# Altium PCB Thunderbolt3.pcbdoc (part 2 of 5)
Units mm, origin at the board's own origin, x right, y up, seen from the top; angles counter-clockwise.
Board outline 43.92 x 41.77 mm, 6 copper layers (TopLayer, MidLayer1, MidLayer2, MidLayer3, MidLayer4, BottomLayer); 211 components, 193 nets, 1132 pads, 744 vias.
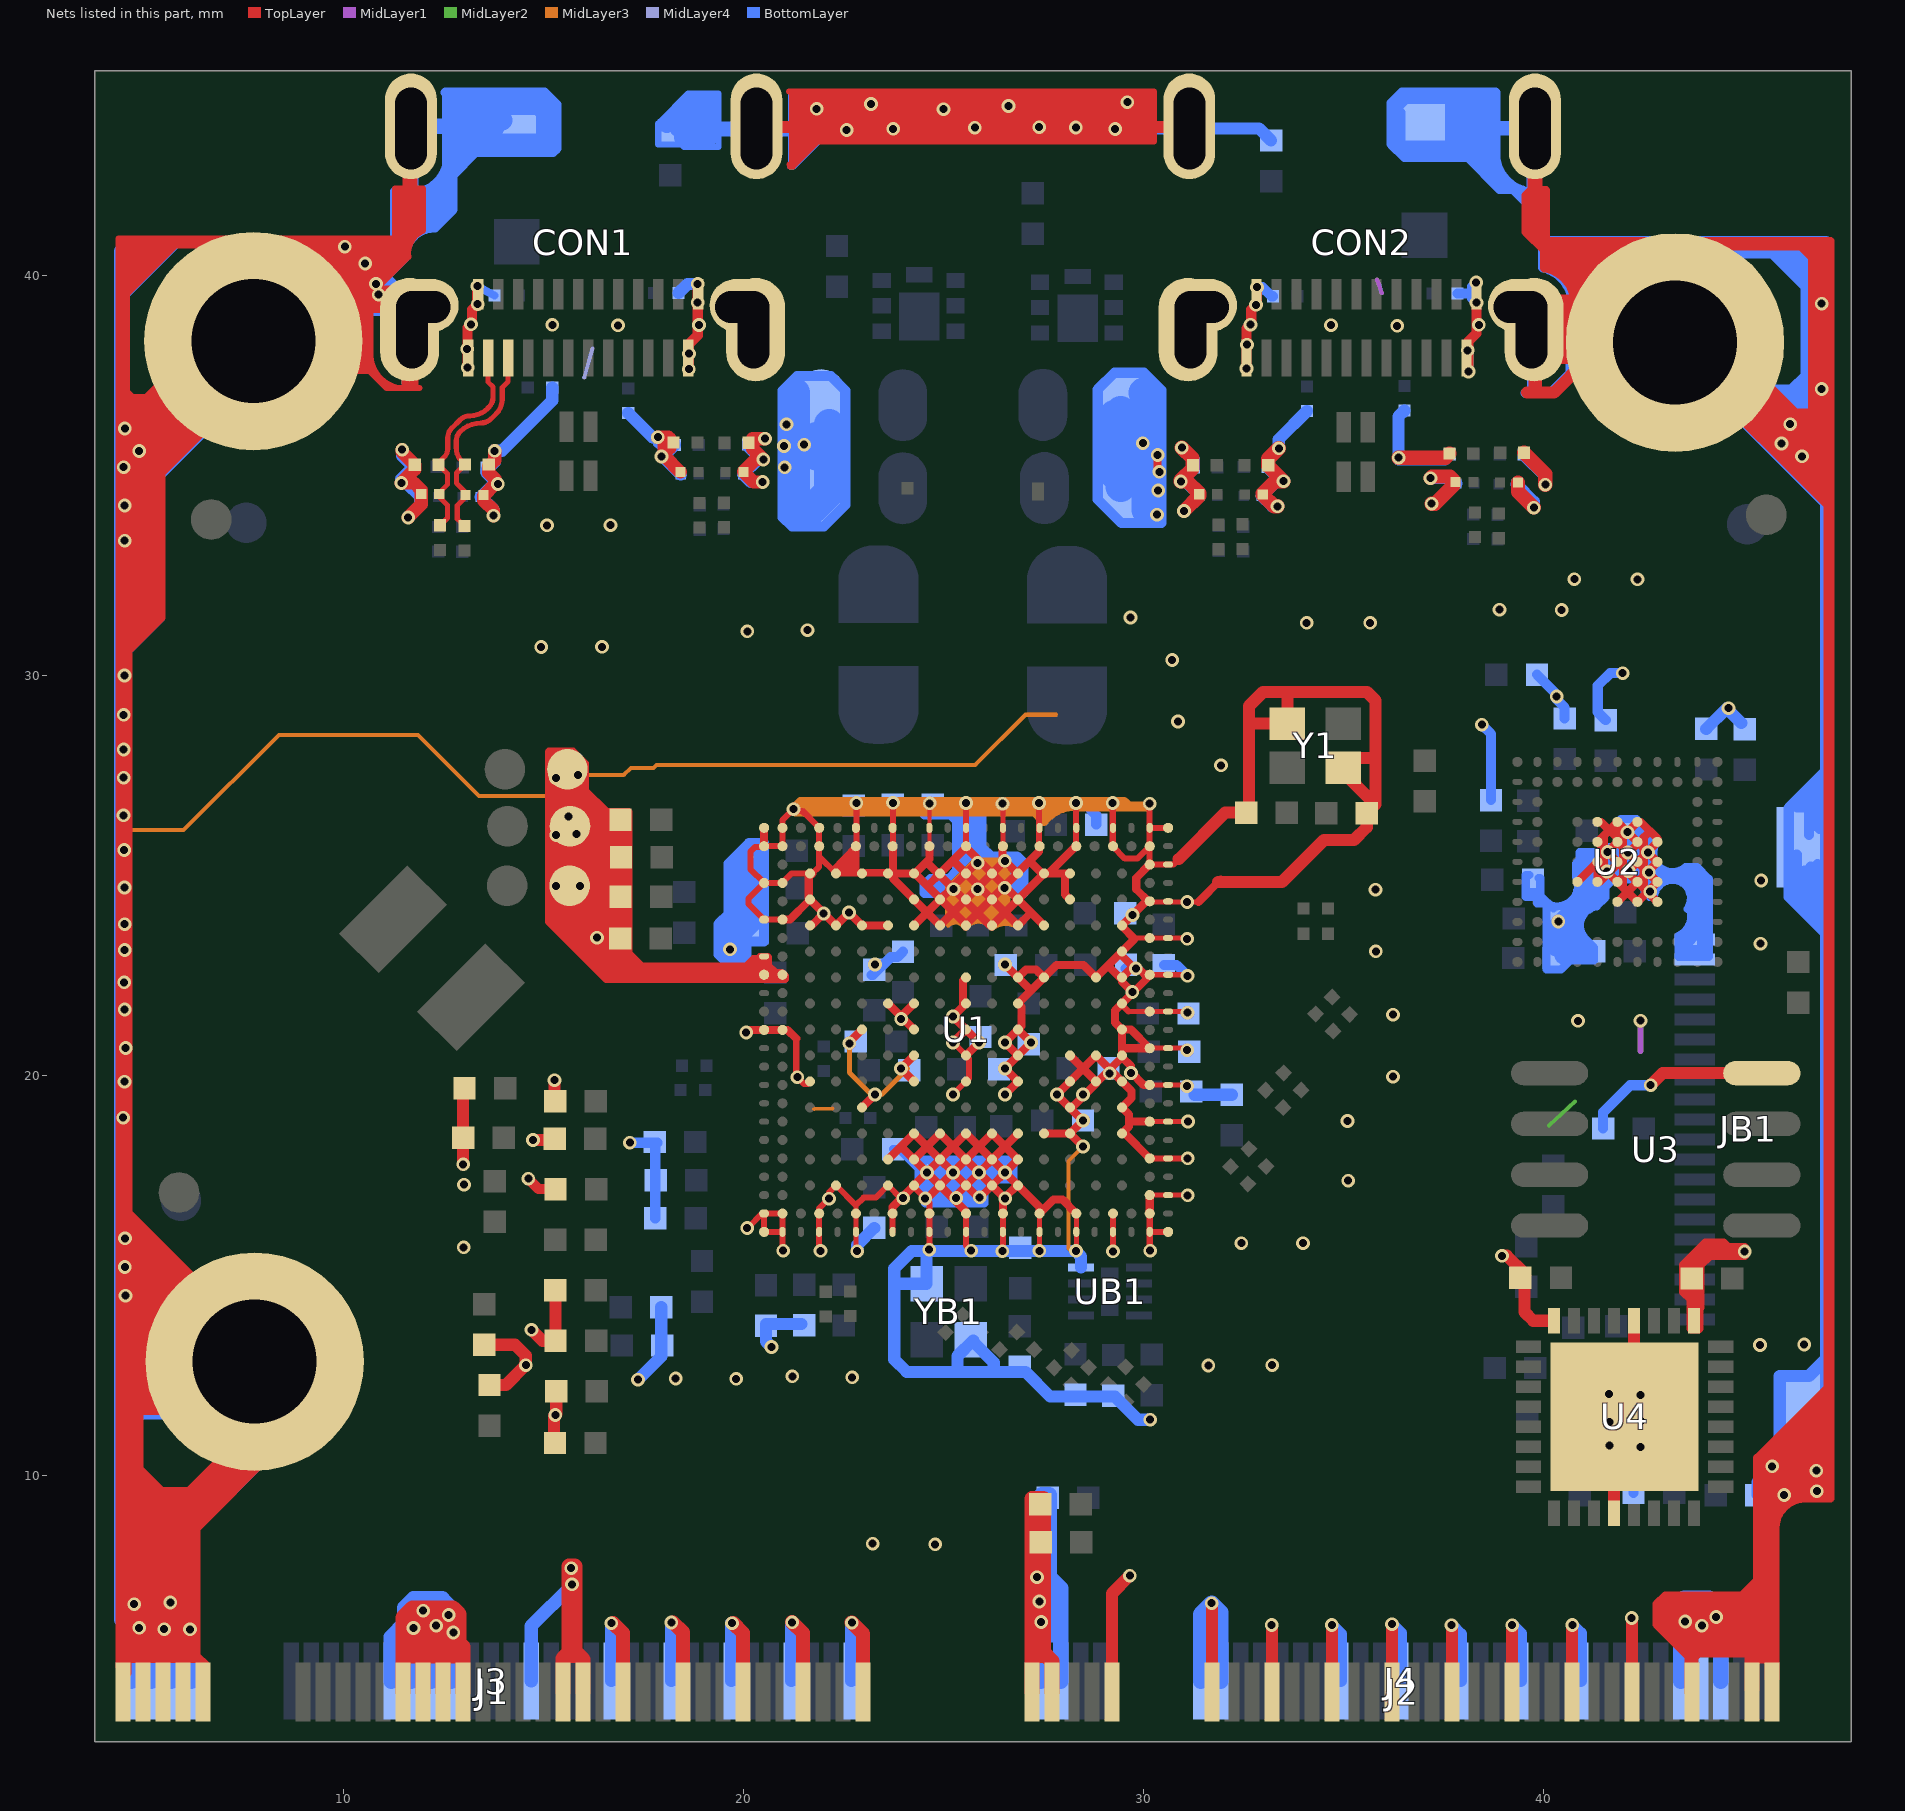
[diagram p6: the nets of this part, all layers, seen from the top]

## Via types
v1: diameter 0.343, hole 0.2, TopLayer to BottomLayer, tented both sides, 632 vias
v2: diameter 0.8, hole 0.8, TopLayer to BottomLayer, 112 vias

## Nets (pads, with @x,y where several pads share a name; then routed paths per layer and width w, separated by ;. In a path a pad name is that pad's centre, name@x,y a point inside that pad or via, vN(x,y) a via of type N, cw(c..) or ccw(c..) an arc to the next point about the centre after c; other vN are vias at no path point)
GND: C9.2 C10.2 C11.1 C12.1 C13.2 C14.2 C15.1 C16.1 C17.1 C36.1 C37.1 C38.1 C39.1 C200.1 C201.1 C202.1 C203.1 C204.1 C205.1 C206.1 C207.2 C208.1 C209.1 C210.2 C211.1 C212.1 C213.2 C214.2 C215.1 C216.2 C219.1 C220.2 CB1.1 CB2.1 CB3.1 CB4.1 CB5.1 CB6.2 CB7.1 CB8.2 CB9.2 CB10.1 CB11.1 CB12.1 CB17.1 CB18.2 CB23.2 CB24.2 CB25.1 CB26.2 CB27.2 CB28.1 CB29.2 CB30.2 CB34.1 CB35.2 CB36.1 CB37.1 CB38.1 CB39.1 CB41.1 CB50.1 CB51.2 CB52.2 CB53.2 CB54.2 CB55.1 CB56.1 CB58.1 CB61.1 CB64.2 CB68.2 CB69.2 CB70.1 CB72.1 CB74.2 CB75.1 CB76.1 CB77.1 CON1.1 CON1.2 CON1.3 CON1.4 CON1.5 CON1.6 CON1.A1 CON1.A12 CON1.B1 CON1.B12 CON2.1 CON2.2 CON2.3 CON2.4 CON2.5 CON2.6 CON2.A1 CON2.A12 CON2.B1 CON2.B12 D1.2 D2.2 D3.2 D4.2 D5.2 D6.2 D7.2 D8.2 DB1.1 DB2.1 DB3.2 DB4.2 DB5.2 DB6.2 DB7.2 DB8.2 DB9.2 DB10.2 J1.1 J1.7 J1.13 J1.19 J1.25 J1.29 J1.31 J1.41 J1.43 J1.45 J1.47 J1.67 J1.69 J1.71 J1.73 J1.75 J2.1 J2.3 J2.9 J2.15 J2.21 J2.27 J2.33 J2.39 J2.45 J2.51 J2.57 J2.67 J2.73 J2.75 J3.2 J3.8 J3.14 J3.20 J3.26 J3.34 J3.42 J3.44 J3.46 J3.48 J3.68 J3.70 J3.72 J3.74 J4.6 J4.8 J4.10 J4.20 J4.26 J4.32 J4.38 J4.44 J4.56 J4.58 J4.72 J4.74 JB1.19 JB1.20 JB1.21 JB1.22 pad.9 pad.10 pad.11 R1.1 R2.2 R3.1 R4.2 R5.1 R6.2 R7.1 R8.2 R11.1 R12.1 R14.1 R15.1 R16.1 R18.1 R19.2 R20.1 R21.1 R22.1 R23.1 RB3.1 RB4.2 RB5.1 RB6.2 RB7.1 RB8.2 RB9.1 RB10.2 RB12.1 RB15.1 RB19.1 RB21.1 RB23.1 RB24.1 RB25.1 RB27.1 RB28.1 RB30.2 RB31.2 U1.A1 U1.A2 U1.A4 U1.A6 U1.A8 U1.A10 U1.A12 U1.A14 U1.A16 U1.A18 U1.A20 U1.A22 U1.A23 U1.AA22 U1.AA23 U1.AB1 U1.AB2 U1.AB4 U1.AB6 U1.AB8 U1.AB10 U1.AB12 U1.AB14 U1.AB16 U1.AB18 U1.AB20 U1.AB22 U1.AC1 U1.AC2 U1.AC4 U1.AC6 U1.AC8 U1.AC10 U1.AC12 U1.AC14 U1.AC16 U1.AC18 U1.AC20 U1.AC22 U1.AC23 U1.B1 U1.B2 U1.B4 U1.B6 U1.B8 U1.B10 U1.B12 U1.B14 U1.B16 U1.B18 U1.B20 U1.B22 U1.C22 U1.C23 U1.D1 U1.D2 U1.D4 U1.D5 U1.D6 U1.D8 U1.D9 U1.D11 U1.D12 U1.D13 U1.D15 U1.D16 U1.D18 U1.E4 U1.E9 U1.E11 U1.E12 U1.E13 U1.E15 U1.E18 U1.E22 U1.E23 U1.F1 U1.F2 U1.F4 U1.F5 U1.F6 U1.F8 U1.F9 U1.F11 U1.F12 U1.F13 U1.F15 U1.F16 U1.F20 U1.G22 U1.G23 U1.H1 U1.H20 U1.J1 U1.J2 U1.J12 U1.J15 U1.J16 U1.J19 U1.J20 U1.J22 U1.J23 U1.L8 U1.L9 U1.L12 U1.L15 U1.L20 U1.L22 U1.L23 U1.M1 U1.M2 U1.M6 U1.M9 U1.M12 U1.M15 U1.M20 U1.N9 U1.N12 U1.N15 U1.N18 U1.N19 U1.N20 U1.N22 U1.N23 U1.R4 U1.R9 U1.R12 U1.R15 U1.R18 U1.R19 U1.R20 U1.R22 U1.R23 U1.T6 U1.T18 U1.T20 U1.U22 U1.U23 U1.V9 U1.V11 U1.V12 U1.V13 U1.V15 U1.V16 U1.V18 U1.V20 U1.W8 U1.W9 U1.W11 U1.W12 U1.W13 U1.W15 U1.W22 U1.W23 U1.Y5 U1.Y8 U1.Y9 U1.Y11 U1.Y12 U1.Y13 U1.Y15 U2.D5 U2.D6 U2.D7 U2.D8 U2.E4 U2.E5 U2.E6 U2.E7 U2.E8 U2.F4 U2.F5 U2.F6 U2.F7 U2.F8 U2.G4 U2.G5 U2.G6 U2.G7 U2.H7 U3.4 U4.0 U4.4 U4.17 U4.20 U4.24 UB1.4 Y1.2 Y1.4 YB1.2 YB1.4 | length 1691
  TopLayer w0.102: U1.B10@24.648,25.747 v1(24.648,26.815)
  TopLayer w0.127: v1@22.806,15.65 22.806,16.763 ; U1.B14@26.478,25.742 v1@26.478,26.795 ; v1@27.397,15.632 U1.AB16@27.397,16.56 ; v1@28.315,15.635 U1.AB18@28.315,16.56 ; 29.618,21.61 U1.L23@30.61,21.61 v1@31.012,21.61 ; 29.679,23.442 v1@30.993,23.442 ; 30,19.773 U1.R23@30.61,19.773 v1@30.917,19.773 ; U1.E22@30.043,24.346 31.366,24.346 ; U1.AA22@30.151,17.019 U1.AA23@30.61,17.019 v1@31.095,17.019 ; U1.U22@30.151,18.855 v1@31.061,18.855 ; U1.N22@30.151,20.692 U1.N23@30.61,20.692 v1@31.152,20.692 ; U1.J22@30.176,22.528 v1@31.065,22.528
  TopLayer w0.152: J1.75@4.618,5.058 4.618,5.4 6.335,5.4 6.573,5.163 J1.67@6.573,5.113 ; J1.75@4.618,5.228 4.365,5.228 4.365,40.938 11.285,40.938 11.285,42.185 11.983,42.185 11.983,41.13 ccw(c12.242,40.555) 11.615,40.478 10.933,39.795 10.933,39.64 11.703,39.64 CON1.4@11.703,39.433 ; J1.67@6.573,4.915 6.573,5.288 6.34,5.52 6.34,8.67 8.23,10.56 8.23,12.995 4.648,16.578 4.648,30.628 5.463,31.443 5.463,35.053 8.033,37.623 10.643,37.623 11.07,37.195 11.89,37.195 11.788,37.195 11.788,38.291 11.523,38.291 11.523,37.195 ; 10.665,37.623 10.665,39.145 11.535,39.145 CON1.4@11.535,39.055 ; 10.665,38.01 ccw(c11.537,38.049) 11.36,37.195 ; 11.653,37.195 CON1.3@11.653,38.195 ; v1(20.06,21.086) v1@20.125,21.151 ; v1@20.095,16.196 20.459,16.56 U1.AB2@20.969,16.56 v1@20.969,15.631 ; U1.AB1@20.51,16.56 U1.AC1@20.51,16.101 U1.AC2@20.969,16.101 ; U1.B1@20.51,25.725 20.285,25.725 20.168,25.608 20.168,25.166 U1.D1@20.51,24.823 ; U1.B1@20.51,25.742 U1.B2@20.969,25.742 20.969,26.392 21.2,26.623 21.465,26.623 U1.A4@21.887,26.201 U1.B4@21.887,25.742 ; U1.F2@20.969,23.905 U1.F1@20.51,23.905 20.118,24.297 20.118,24.431 U1.D1@20.51,24.823 ; 21.15,42.78 21.208,42.838 21.208,44.605 21.133,44.605 30.253,44.605 30.253,43.36 21.853,43.36 21.228,42.735 21.153,42.735 ; 21.313,20.93 21.313,19.995 21.505,19.803 21.6,19.803 U1.R4@21.658,19.86 ; v1(21.918,15.626) 21.887,15.656 21.887,16.687 v1(22.13,16.93) 22.13,17.083 U1.Y5@22.308,17.26 22.806,16.763 23.001,16.958 23.305,16.958 U1.Y8@23.608,17.26 v1@23.925,16.943 ; U1.D5@22.232,25.136 U1.B6@22.815,25.751 ; 22.413,25.203 22.815,25.145 22.718,25.455 22.62,25.27 22.772,25.282 ; v1(22.815,26.821) U1.B6@22.815,25.751 ; U1.AC8@23.724,16.101 U1.AB8@23.724,16.56 ; U1.B8@23.73,25.748 v1(23.73,26.826) ; U1.Y9@24.234,17.236 24.642,16.829 24.642,15.657 v1(24.638,15.653) ; v1(25.233,19.535) 25.633,19.935 25.633,20.435 v1(25.233,20.835) ; U1.B12@25.555,25.747 v1(25.555,26.823) ; U1.AB12@25.56,16.608 25.56,15.756 v1(25.688,15.628) ; v1(26.465,15.618) 26.478,15.631 U1.AB14@26.478,16.56 ; U1.B16@27.383,25.755 v1(27.383,26.821) ; U1.B18@28.308,25.749 v1(28.308,26.823) ; v1(29.225,26.823) 29.225,25.735 29.528,25.433 29.838,25.433 U1.B22@30.147,25.742 ; v1@29.233,15.728 U1.AB20@29.233,16.56 ; U1.L20@29.438,21.79 29.618,21.61 ; U1.C22@30.148,25.286 30.148,25.623 v1(30.148,26.806) ; U1.A22@30.148,26.201 U1.A23@30.61,26.201 ; v1@30.151,15.735 U1.AB22@30.151,16.56 ; U1.AC22@30.151,16.101 U1.AC23@30.61,16.101 ; U1.W22@30.151,17.937 v1(31.1,17.938) ; U1.J22@30.151,22.503 U1.J22@30.176,22.528 ; U1.C22@30.151,25.282 U1.C23@30.61,25.282 30.74,25.282 30.875,25.418 ; U1.D1@20.51,24.823 20.964,24.823 21.2,25.06 21.72,25.06 21.887,25.227 U1.B4@21.887,25.742 ; U1.B4@21.887,25.742 21.887,25.481 U1.D5@22.308,25.06 ; U1.D5@22.308,25.06 U1.D8@23.608,25.06 23.608,25.099 22.815,25.099 U1.B6@22.815,25.751 ; U1.D5@22.308,25.06 U1.B6@22.815,25.751
  TopLayer w0.203: v1@20.125,21.151 21.093,21.151 21.313,20.93 ; U1.B1@20.51,25.725 U1.A1@20.51,26.201 ; U1.F2@20.969,23.905 21.153,23.905 21.625,24.378 21.625,24.965 U1.D4@21.72,25.06 ; U1.F4@21.658,23.76 21.7,23.76 v1(21.998,24.058) ; U1.E4@21.658,24.41 U1.F5@22.308,23.76 v1(22.633,24.085) U1.F6@22.958,23.76 U1.F8@23.608,23.76 ; v1@22.64,20.843 U1.M6@22.958,21.16 ; U1.T6@22.958,19.21 v1(23.283,19.535) ; U1.W8@23.608,17.91 U1.V9@24.258,18.56 v1@25.853,16.965 ; U1.L8@23.608,21.81 U1.M9@24.258,21.16 ; U1.D8@23.608,25.06 U1.D9@24.283,25.06 ; U1.AB8@23.724,16.56 23.724,16.726 U1.V12@25.558,18.56 27.397,16.722 U1.AB16@27.397,16.56 27.745,16.908 27.967,16.908 U1.AB18@28.315,16.56 ; U1.B8@23.73,25.748 23.73,24.938 U1.F11@24.908,23.76 26.47,25.323 U1.B14@26.47,25.75 ; v1@23.935,21.488 U1.L9@24.258,21.81 ; 23.974,18.194 25.56,16.608 U1.AB12@25.56,16.56 ; U1.W9@24.258,17.91 U1.V11@24.908,18.56 v1@26.533,16.935 ; U1.R9@24.258,19.86 v1(23.933,20.185) U1.N9@24.258,20.51 ; U1.F9@24.258,23.76 v1@25.825,25.328 ; v1@24.58,16.933 U1.V13@26.208,18.56 U1.W15@26.858,17.91 v1@25.913,16.965 ; 24.583,25.36 24.583,25.33 26.153,23.76 U1.F13@26.208,23.76 U1.D16@27.508,25.06 ; 24.613,24.765 U1.D11@24.908,25.06 U1.B12@25.555,25.708 ; U1.B10@24.648,25.747 24.648,25.425 U1.D9@24.283,25.06 ; v1(25.233,20.835) U1.M12@25.558,21.16 ; 25.274,25.344 U1.F15@26.858,23.76 27.152,24.054 ; v1@25.313,17.015 U1.V15@26.858,18.56 ; U1.B12@25.555,25.747 25.555,25.713 U1.F16@27.508,23.76 ; U1.N12@25.558,20.51 v1(25.883,20.835) v1(25.233,21.485) 25.478,21.73 25.478,22.38 U1.J12@25.558,22.46 ; U1.AB14@26.478,16.56 v1@26.478,16.876 ; v1(26.528,25.378) U1.D15@26.83,25.075 ; v1(26.533,19.535) U1.R15@26.858,19.86 v1(26.533,20.185) U1.N15@26.858,20.51 ; v1(26.533,22.785) 27.123,22.195 ; v1@26.538,16.968 U1.Y15@26.844,17.274 ; U1.M15@26.858,21.16 v1(27.183,20.835) U1.N15@26.858,20.51 ; U1.J15@26.858,22.46 27.055,22.658 27.31,22.658 U1.J16@27.508,22.46 ; 27.147,25.374 27.46,25.06 U1.D18@28.158,25.06 ; U1.B16@27.383,25.755 27.383,25.61 25.558,23.785 U1.D9@24.283,25.06 ; U1.V16@27.508,18.56 U1.V18@28.158,18.56 ; U1.D16@27.619,25.06 U1.B18@28.308,25.749 ; 28.035,24.955 28.035,24.533 U1.E18@28.158,24.41 ; U1.N18@28.158,20.51 U1.R19@28.797,19.871 ; U1.T18@28.203,19.21 U1.N20@29.458,20.465 ; v1@28.47,18.885 27.833,19.523 v1(27.833,19.535) U1.N19@28.808,20.51 29.693,19.625 29.693,19.445 U1.T20@29.458,19.21 29.633,19.035 29.633,18.735 U1.V20@29.458,18.56 29.528,18.56 U1.W22@30.151,17.937 ; v1(28.483,18.235) U1.V18@28.158,18.56 ; v1(28.483,18.885) U1.V18@28.158,18.56 ; 29.17,22.69 29.458,22.403 U1.J20@29.458,22.353 ; U1.H20@29.458,23.003 v1@29.775,22.685 ; U1.F20@29.458,23.741 29.773,23.426 U1.J19@28.808,22.46 28.495,22.773 27.82,22.773 U1.L15@26.858,21.81 26.94,21.728 26.94,21.243 v1(26.533,20.835) U1.N15@26.858,20.51 ; U1.F20@29.458,23.76 U1.E22@30.043,24.346 ; 29.474,20.692 U1.N22@30.151,20.692 29.682,21.16 U1.M20@29.458,21.16 ; v1(29.715,22.095) U1.J20@29.458,22.353 ; 29.753,18.855 U1.U22@30.151,18.855 ; U1.E22@30.133,24.346 29.813,24.666 29.813,24.951 U1.C22@30.148,25.286 ; U1.AB22@30.151,16.56 U1.AA22@30.151,17.019 ; U1.R22@30.151,19.773 30,19.773 29.68,20.093 29.68,20.243 U1.N20@29.458,20.465 ; v1(30.348,35.523) 30.348,35.101 v1(30.39,35.101) ; 31.366,24.346 31.925,24.905 ; v2(39.7,38.291) 39.715,38.291 39.715,37.105 39.855,37.105 CON2.6@39.855,37.783 ; 39.773,41.778 39.693,41.778 39.693,43.11 39.868,43.11 39.868,41.578 ; CON2.6@39.778,37.903 40.953,37.903 40.953,39.433 39.843,39.433 CON2.5@39.843,39.188 ; 40.53,38.008 40.53,39.313 40.81,39.313 pad.10@40.81,38.098 ; pad.10@40.703,38.885 40.703,39.21 ; pad.10@40.72,38.013 pad.10@40.72,39.095 ; 40.765,39.433 ccw(c39.867,39.293) 40.013,40.19 40.013,40.628 39.548,41.093 39.548,42.015 39.673,42.14 40.06,42.14 40.06,40.87 47.165,40.87 47.165,9.433 46.535,9.433 ccw(c46.535,8.693) 45.795,8.693 45.795,4.93 45.62,4.93 45.62,5.41 45.298,5.41 45.298,4.663 45.123,4.663 45.123,5.565 43.885,5.565 43.773,5.453 43.773,4.598 43.623,4.598 43.623,5.478 42.82,6.28 42.82,6.793 43.038,7.01 44.955,7.01 45.338,7.393 45.338,10.453 47.1,12.215 47.1,34.255 43.793,37.563 pad.10@42.643,37.563 ; U2.H7@40.843,24.851 U2.E4@42.343,26.351 42.425,26.351 42.843,25.933 U2.D5@42.843,25.851 U2.F7@41.843,24.851 ; U2.G6@41.343,25.228 U2.G7@41.343,24.851 41.396,24.851 42.66,26.115 ; U2.G6@41.343,25.351 U2.E8@42.343,24.351 U2.D7@42.843,24.851 U2.F5@41.843,25.851 ; U2.G4@41.343,26.351 41.432,26.351 U2.F5@41.843,25.94 ; v1@41.448,25.113 41.5,25.165 41.5,26.008 ; 41.783,26.115 41.985,26.115 41.985,24.708 ; U2.F8@41.843,24.351 U2.D6@42.843,25.351 U2.F4@41.843,26.351 U2.G5@41.343,25.851 U2.D8@42.843,24.351 ; 42.501,24.693 42.501,25.975 ; pad.10@43.433,40.12 44.043,40.73 46.428,40.73 46.705,40.453 46.705,36.585 46.29,36.585 pad.10@45.153,37.723 ; U1.N20@29.458,20.465 U1.M20@29.458,21.16 ; U1.M20@29.458,21.16 29.285,21.333 29.285,21.638 30.151,22.503 U1.J22@30.151,22.528 30.028,22.528 29.87,22.685 29.683,22.685 U1.J20@29.458,22.46 U1.J20@29.458,22.353 ; 15.13,23.853 15.13,28.103 15.728,28.103 16.025,27.805 16.025,27.14 16.57,26.595 17.12,26.595 17.12,23.063 17.445,22.738 20.07,22.738 20.248,22.915 20.36,22.915 20.41,22.965 20.6,22.965 20.6,22.76 20.793,22.568 20.958,22.568 21.028,22.498 21.028,22.42 20.969,22.42 16.563,22.42 15.13,23.853
  TopLayer w0.254: v1(13.098,37.708) 13.098,38.706 13.205,38.813 13.205,39.151 13.34,39.286 v1(13.34,39.741) ; v1(14.615,17.431) 14.878,17.168 R16.1@15.295,17.168 ; v1(18.628,37.666) 18.628,38.29 18.85,38.513 v1(18.85,39.796) ; v1(32.568,37.683) 32.568,38.678 32.688,38.798 32.688,39.158 32.833,39.303 v1(32.833,39.716) ; v1(38.12,37.611) 38.12,38.365 38.32,38.565 v1(38.32,39.328) ; 43.748,14.553 43.748,15.283 44.113,15.648 44.498,15.648 ; 43.515,14.6 43.695,14.42 43.695,13.683 43.87,13.683 43.87,14.185 43.895,14.21 43.895,15.275 44.138,15.518 45.023,15.518 v1(45.023,15.611) 45.023,15.693 44.603,15.693 44.493,15.803 44.05,15.803 43.515,15.268 43.515,14.6
  TopLayer w0.305: 4.718,36.865 4.505,37.078 4.505,39.58 5.758,40.833 11.445,40.833 11.445,42.035 11.718,42.035 ; v1(12.985,17.788) R12.1@12.985,19.653 ; R18.1@13.518,13.278 14.282,13.278 14.553,13.008 v1(14.553,12.768) 14.055,12.271 R19.2@13.645,12.271 ; v1(14.693,13.651) 14.968,13.376 R22.1@15.295,13.376 15.295,14.638 R21.1@15.29,14.643 ; v1(14.73,18.396) R15.1@15.168,18.396 ; R20.1@15.258,10.938 15.258,11.491 15.313,11.546 R23.1@15.313,12.116 ; R14.1@15.27,19.395 v1(15.27,19.891) ; v2(20.32,43.738) 20.341,43.718 CON2.1@30.84,43.718 ; J2.67@29.208,4.598 29.208,7.061 v1(29.653,7.506) ; 30.875,25.418 32.038,26.581 C12.1@32.565,26.581 32.63,26.646 32.63,29.248 32.98,29.598 35.583,29.598 35.798,29.383 35.798,26.791 C13.2@35.575,26.568 35.575,26.215 35.255,25.895 34.508,25.895 33.457,24.844 31.864,24.844 ; J2.57@31.708,4.598 v1@31.708,6.818 ; 32.713,28.808 Y1.4@33.593,28.808 33.593,29.598 ; J2.51@33.208,4.598 v1@33.208,6.253 ; J2.45@34.708,4.598 v1@34.708,6.271 ; 35.685,26.89 34.993,27.583 Y1.2@34.993,27.708 34.993,27.943 35.798,27.943 ; J2.39@36.208,4.598 v1(36.208,6.291) ; J2.33@37.708,4.598 v1@37.708,6.268 ; v1(38.958,15.501) 39.077,15.501 39.518,15.06 39.518,14.098 39.74,13.876 U4.24@40.255,13.876 ; J2.27@39.208,4.598 v1@39.208,6.268 ; 39.583,37.08 40.255,37.08 pad.10@41.045,37.87 ; J2.21@40.708,4.598 v1@40.708,6.273 ; U4.4@41.755,9.068 U4.0@41.755,9.983 ; J2.15@42.208,4.598 v1@42.208,6.433 ; U4.0@42.255,12.945 U4.20@42.255,13.876 ; v1(42.673,19.766) 42.975,20.068 U3.4@45.453,20.068
  TopLayer w0.33: v1(11.46,35.656) 11.46,35.593 R1.1@11.778,35.276 11.778,35.161 v1(11.44,34.823) 11.757,34.823 11.94,34.64 11.94,34.288 v1(11.613,33.961) ; v1(13.745,34.003) 13.745,34.135 13.498,34.383 13.498,34.505 13.791,34.798 13.791,34.912 13.628,35.075 13.628,35.24 13.775,35.388 v1(13.775,35.626) ; v1(17.853,35.966) 18.115,35.966 18.155,35.925 18.155,35.698 v1(17.943,35.486) 18.013,35.556 18.013,35.863 ; v1@18.025,35.486 D3.2@18.418,35.093 ; v1(20.473,34.846) 20.248,34.846 D4.2@19.993,35.101 20.303,35.411 v1(20.49,35.411) 20.228,35.673 20.228,35.92 20.22,35.928 v1(20.533,35.928)
  TopLayer w0.356: 4.718,36.865 5.098,36.865 6.098,37.865 pad.9@6.15,37.865 ; v1@16.735,6.316 16.98,6.071 J1.25@16.98,4.598 ; v1@18.233,6.336 18.48,6.088 J1.19@18.48,4.598 ; v1@19.738,6.316 19.98,6.073 J1.13@19.98,4.598 ; v1(21.21,6.338) 21.48,6.068 J1.7@21.48,4.598 ; v1(22.703,6.331) 22.98,6.053 J1.1@22.98,4.598 ; v1(30.953,35.703) 31.218,35.438 31.218,35.18 30.928,34.89 v1(30.928,34.858) 31.092,34.858 31.388,34.563 31.388,34.503 v1(31.005,34.121) ; v1(33.343,34.238) 33.262,34.238 32.978,34.523 32.978,34.56 33.283,34.866 v1(33.495,34.866) 33.115,35.245 33.115,35.426 v1(33.378,35.688) ; v1(36.373,35.453) 37.543,35.453 R7.1@37.645,35.556 ; v1(37.17,34.943) 37.21,34.983 37.658,34.983 37.743,34.898 37.743,34.765 37.281,34.303 v1(37.198,34.303) ; D8.2@39.355,34.836 39.355,34.603 v1(39.753,34.206) ; R8.2@39.51,35.576 40.04,35.046 v1(40.04,34.778)
  TopLayer w0.381: 4.493,5.46 4.493,30.685 5.288,31.48 5.288,35.198 7.903,37.813 10.47,37.813 10.47,39.28 11.558,39.28 11.558,39.565 10.788,39.565 10.788,39.88 11.445,40.538 11.445,40.833 ; 4.65,5.588 6.183,5.588 6.183,8.693 8.31,10.82 pad.11@8.31,12.118 ; pad.11@7.285,11.71 4.805,11.71 4.805,10.14 5.42,9.525 6.16,9.525 7.97,11.335 pad.11@7.97,11.748 ; J1.47@11.48,4.598 11.48,6.455 11.718,6.693 12.733,6.693 12.883,6.543 12.883,5.823 12.98,5.725 J1.41@12.98,4.598 ; 11.48,5.428 11.55,5.498 12.98,5.498 ; 11.533,40.935 11.785,41.188 11.785,41.995 11.658,41.995 11.658,43.174 v2(11.68,43.174) ; 11.583,41.208 11.583,41.92 ; 11.615,5.938 12.243,5.938 ; v1@11.64,6.138 12.48,6.138 ; 11.678,5.733 12.68,5.733 12.68,6.368 11.833,6.368 ; J1.45@11.98,4.598 v1@11.98,6.46 ; J1.43@12.48,4.598 12.48,6.315 ; J1.31@15.48,4.598 15.48,5.435 15.633,5.588 15.633,7.74 15.775,7.74 15.775,5.615 15.98,5.41 J1.29@15.98,4.598 ; 15.562,5.516 15.874,5.516 ; C9.2@15.7,27.895 15.8,27.795 15.8,27.075 16.458,26.418 16.91,26.418 16.91,23 17.15,22.76 ; 16.843,22.568 19.918,22.568 ; 20.163,22.633 U1.J1@20.545,22.633 ; 20.388,22.748 20.47,22.748 ; 21.363,43.038 21.363,44.448 30.11,44.448 30.11,43.505 21.725,43.505 21.53,43.31 ; 21.578,43.903 29.893,43.903 29.893,44.205 21.588,44.205 ; J2.75@27.208,4.598 27.208,9.428 27.49,9.428 27.49,5.58 27.708,5.363 J2.73@27.708,4.598 ; 27.208,5.518 27.428,5.518
  TopLayer w0.432: 39.748,41.67 39.748,41.085 40.213,40.62 40.213,40.34 ; 40.295,40.41 41.055,39.59 pad.10@40.953,39.345 ; 40.415,40.61 pad.10@44.145,40.61 ; 40.603,40.405 pad.10@43.165,40.405 ; 40.76,40.085 pad.10@43.92,40.085 ; pad.10@43.153,40.213 pad.10@43.525,40.213
  TopLayer w0.483: 43.195,6.36 45.368,6.36 ; 43.43,6.055 45.318,6.055 ; 43.698,5.658 43.055,6.3 43.055,6.75 45.53,6.75 45.53,5.59 45.323,5.59 ; 43.918,5.768 45.403,5.768 ; pad.10@44.73,37.528 46.815,35.443 ; 45.193,6.943 45.585,7.335 ; 45.568,6.913 45.568,10.355 47.028,11.815 ; 45.803,9.245 46.228,9.67 46.33,9.67 47.028,9.67 47.028,11.85 ; v1@45.915,9.508 45.915,10.238 46.83,11.153 ; 45.995,9.988 46.563,9.988 ; 46.268,10.385 46.698,10.385 ; 46.455,36.043 46.633,36.043 ; 46.688,40.71 46.915,40.71 46.915,36.67 ; v1@46.738,9.98 46.785,10.028 46.785,10.87 ; v1@46.798,9.67 v1@46.798,10.113 ; 46.96,35.07 46.96,36.338 46.713,36.338 46.16,36.338 44.763,37.735 43.88,37.735 46.98,34.635
  TopLayer w0.508: 4.588,39.88 4.588,40.745 5.373,40.745 ; 4.675,39.97 5.03,40.49 ; pad.9@8.513,40.628 11.03,40.628 ; pad.9@8.585,40.308 v1(10.538,40.308) ; pad.9@8.92,40.055 10.178,40.055 ; 10.29,39.69 10.29,40.255 v1@10.538,40.255 ; 10.43,39.388 10.43,39.898 10.935,40.403
  TopLayer w0.559: 4.573,16.265 4.573,12.063 4.815,11.82 ; 4.603,31.028 4.603,36.735 ; 4.713,9.86 4.713,5.893 5.793,5.893 5.793,8.783 pad.11@7.993,10.983 ; 4.718,16.153 7.873,12.998 7.873,12 4.883,12 ; 4.753,36.593 5.38,36.593 pad.9@6.358,37.57 ; 4.8,9.755 5.275,9.28 5.775,9.28 ; 5.008,12.17 5.008,15.603 ; 5.048,31.453 5.048,36.288 ; 5.16,9.13 5.16,6.166 5.505,6.166 5.505,8.943 ; 5.228,15.103 5.228,12.223 pad.11@7.653,12.223 ; 5.328,36.283 pad.9@6.613,37.568 ; 5.34,35.705 pad.9@6.908,37.273 ; pad.11@5.56,13.635 5.56,13.465 6.92,13.058 6.625,13.178 5.56,14.3 5.56,12.97 5.56,13.153 7.668,12.775 pad.11@5.785,14.683 ; 5.56,14.87 5.56,12.588 pad.11@7.635,12.588 ; C9.2@15.405,27.868 15.405,24.005 16.668,22.743
  TopLayer w0.584: 15.805,23.863 15.805,26.773 ; 16.208,23.658 16.208,26.41 ; 16.503,23.23 16.503,26.27
  MidLayer1 w0.102: 35.829,39.91 35.951,39.57
  MidLayer1 w0.152: 42.42,20.627 v1(42.42,21.378)
  MidLayer2 w0.102: 40.136,18.755 40.78,19.362
  MidLayer3 w0.102: 4.586,26.143 5.996,26.143 8.378,28.525 11.856,28.525 13.381,27 15.156,27 v1@15.753,26.403 ; v1(15.853,27.518) 17.001,27.518 17.181,27.698 17.746,27.698 17.818,27.77 25.788,27.77 27.046,29.028 27.806,29.028 ; 21.764,19.17 22.221,19.183 ; v1@28.251,15.553 28.118,15.685 28.118,17.873 28.481,18.235 v1(28.483,18.235)
  MidLayer3 w0.127: v1(22.64,20.815) 22.64,20.085 23.191,19.535 23.448,19.535 v1@24.092,20.179
  MidLayer3 w0.152: 47.131,14.876 47.131,23.95 ; 25.113,23.79 cw(c25.293,23.582) 25.546,23.693 cw(c25.873,23.5) 26.201,23.693 cw(c26.548,23.294) 26.861,23.72 26.596,23.985 26.596,25.378 25.788,25.378 25.113,24.703 25.113,23.79
  MidLayer3 w0.254: 27.186,26.65 27.703,26.65 ; 29.626,26.733 29.511,26.848 21.425,26.848 v1(21.243,26.666) 21.301,26.608 27.271,26.608 27.501,26.378 cw(c28.248,25.801) 28.398,26.733 30.075,26.733 v1(30.148,26.806)
  MidLayer3 w0.33: 25.253,23.99 25.253,24.563 25.893,25.203 26.413,25.203 26.413,23.98 ; 25.498,24.088 25.498,24.43 26.153,25.085 ; 25.518,23.93 25.616,24.045 25.953,24.045 26.201,23.953 26.496,23.97 ; 25.593,24.525 26.033,24.525 ; 25.716,24.263 25.921,24.263 ; v1@26.008,24.71 26.028,24.71 ; 26.176,24.24 26.176,24.928
  MidLayer4 w0.102: 16.014,37.458 16.22,38.187 ; 35.888,39.814 35.951,39.57
  BottomLayer w0.102: 20.038,23.853 20.038,24.123 ; CB51.2@20.066,23.7 20.066,24.053
  BottomLayer w0.152: 17.863,43.81 17.863,43.283 18.446,43.283 18.511,43.218 19.371,43.218 19.371,44.553 18.606,44.553 17.908,43.855 ; 18.981,43.565 21.278,43.565 21.278,43.788 19.006,43.788 19.006,43.748 ; 19.111,43.665 21.501,43.665 ; 21.181,44.548 21.181,42.755 21.158,42.733 21.243,42.733 21.888,43.378 30.231,43.378 30.231,44.595 21.181,44.595
  BottomLayer w0.203: v1(13.34,39.741) CB12.1@13.768,39.505 ; CB64.2@23.733,18.168 23.876,18.168 C216.2@24.526,17.518 ; C216.2@24.424,17.619 24.424,17.903 26.743,17.903 26.743,17.415 26.356,17.415 26.013,17.073 26.013,16.808 24.538,16.808 24.538,17.018 24.376,17.18 24.376,17.713 C216.2@24.496,17.833 ; CB38.1@39.648,25.02 39.598,25.02 39.551,25.02 39.551,24.473 39.841,24.473 40.071,24.243 40.071,22.658 40.436,22.658 40.658,22.88 41.26,22.88 41.26,23.205 40.828,23.638 ; 39.688,24.598 39.783,24.598 39.836,24.598 39.836,24.314 39.999,24.314 ; CB38.1@39.871,24.948 39.913,24.948 39.913,24.515 CB36.1@40.248,24.18 ; 40.161,24.268 ccw(c40.334,24.758) 40.808,24.973 ; 41.041,23.425 cw(c41.392,23.76) 41.326,24.24 41.541,24.455 41.541,24.72 41.728,24.908 42.391,24.908 42.523,24.775 42.523,24.595 42.641,24.478 42.761,24.478 cw(c43.22,24.44) 43.593,24.17 ; 41.116,24.488 41.116,24.665 40.808,24.973 ; 43.638,24.253 cw(c43.119,24.01) 43.366,23.493 43.366,22.978 44.126,22.978 44.126,24.928 43.833,25.22 43.546,25.22 cw(c43.22,25.573) 42.781,25.765 42.316,26.23 42.316,26.42 41.926,26.42 41.926,25.715 41.541,25.715 41.416,25.59 40.896,25.59 40.896,25.398 40.808,25.31 40.808,24.973
  BottomLayer w0.254: 4.453,16.535 4.518,16.535 8.073,12.98 8.073,10.483 5.441,7.85 ; 4.453,30.5 5.406,31.453 5.406,35.008 8.441,38.043 pad.9@8.851,38.043 ; 4.453,40.618 4.453,40.693 4.586,40.825 11.291,40.825 11.291,42.113 ccw(c11.651,43.025) 12.591,42.745 ; 4.566,39.575 5.798,40.808 5.798,40.825 ; 4.683,39.863 5.501,40.68 ; 4.686,39.993 4.686,40.483 4.858,40.655 5.313,40.655 4.928,40.27 ; 4.788,40.19 4.983,40.385 4.983,40.535 ; 4.791,40.41 4.906,40.41 ; 10.618,39.083 10.618,39.548 11.521,40.45 cw(c12.266,40.465) 12.276,41.21 ; 11.983,41.21 12.276,41.21 ; 12.543,44.585 15.013,44.585 15.313,44.285 15.313,43.18 15.231,43.098 13.291,43.098 12.723,42.53 12.723,41.658 12.276,41.21 ; 12.591,42.18 12.591,44.585 12.888,44.585 ; v1(17.153,18.328) RB23.1@17.841,18.328 ; RB25.1@17.79,16.438 RB23.1@17.79,18.328 ; 19.631,22.93 19.566,22.995 19.566,23.778 19.838,24.05 19.838,25.263 20.204,25.628 CB53.2@20.31,25.628 ; 19.711,23.365 19.711,23.798 20.036,24.123 20.036,25.283 ; 19.773,22.903 19.773,23.233 20.378,23.838 CB53.2@20.378,25.433 ; 19.891,23.02 19.891,23.773 ; 19.901,23.853 20.038,23.853 ; CB51.2@20.066,23.7 20.236,23.87 20.236,25.325 ; C209.1@23.198,22.525 23.233,22.525 23.676,22.968 23.845,22.968 C208.1@23.983,23.105 ; v1(24.648,26.815) 25.626,26.815 25.943,26.498 25.943,25.72 26.176,25.488 26.828,25.488 26.988,25.328 26.988,24.573 24.528,24.573 24.528,24.783 24.668,24.923 25.133,24.923 25.336,25.125 25.336,26.373 25.176,26.533 24.528,26.533 24.528,26.815 C202.1@24.868,26.815 ; C203.1@24.723,24.693 26.853,24.693 26.853,25.315 26.031,25.315 25.738,25.608 25.738,26.455 25.538,26.655 25.058,26.655 ; C203.1@25.128,24.828 25.533,25.233 25.533,26.175 25.401,26.308 ; 25.226,24.88 C205.1@26.743,24.88 ; 25.391,26.5 25.456,26.5 CB30.2@25.598,26.358 ; 25.406,24.995 C204.1@25.846,24.995 ; 25.634,25.216 v1@25.924,25.216 ; 25.643,25.075 26.446,25.075 ; 25.703,25.438 26.001,25.14 26.721,25.14 ; v1(28.308,26.823) 28.508,26.823 28.813,26.518 RB12.1@28.813,26.28 ; C206.1@29.548,22.685 v1(29.803,22.685) ; RB15.1@30.505,22.77 30.823,22.77 v1(31.093,22.501) ; v1(32.833,39.716) 32.968,39.716 33.193,39.49 CB6.2@33.233,39.49 ; 36.333,44.205 36.546,44.418 38.546,44.418 38.546,42.848 ; 36.376,43.153 38.093,43.153 38.928,42.318 ; 36.413,44.088 36.413,43.263 38.201,43.263 38.383,43.08 ; 37.658,44.325 37.658,43.398 38.468,43.398 38.468,43.263 ; 37.736,43.398 37.736,44.325 38.303,44.325 38.303,43.16 ; CB3.1@37.843,39.56 38.191,39.56 ; 37.911,44.113 37.911,43.64 38.153,43.64 38.153,44.235 ; 38.041,43.925 38.041,44.173 ; v1(38.12,37.611) v1@38.12,38.138 ; v1(38.313,39.836) 38.211,39.734 38.211,39.438 v1(38.32,39.328) ; v1(38.453,28.781) 38.683,28.55 CB29.2@38.683,26.893 ; 38.623,42.81 38.676,42.81 ; 38.791,42.625 38.791,44.58 36.463,44.58 36.201,44.318 36.201,43.293 36.523,42.97 38.106,42.97 38.898,42.178 39.238,42.178 39.983,41.433 ; 38.791,42.908 ccw(c39.788,43.086) 39.613,42.088 ; 39.328,42.088 39.983,42.088 39.983,40.215 ; 39.499,41.916 39.942,41.916 ; CON2.2@39.518,43.63 38.428,43.63 38.428,43.743 CON2.2@39.663,43.743 ; 39.543,37.07 40.271,37.07 ; CON2.5@39.721,38.656 CON2.6@39.76,38.656 ; CON2.6@39.806,37.955 42.621,37.955 42.621,39.275 39.821,39.275 CON2.5@39.821,38.99 ; CON2.6@39.806,37.981 pad.10@42.621,37.981 ; CON2.6@39.806,38.007 pad.10@42.621,38.007 ; CON2.6@39.806,38.033 pad.10@42.621,38.033 ; CON2.6@39.806,38.059 pad.10@42.621,38.059 ; CON2.6@39.806,38.085 pad.10@42.621,38.085 ; CON2.6@39.807,38.111 pad.10@42.622,38.111 ; CON2.6@39.807,38.136 pad.10@42.622,38.136 ; CON2.6@39.807,38.162 pad.10@42.622,38.162 ; CON2.6@39.807,38.188 pad.10@42.622,38.188 ; CON2.6@39.807,38.214 pad.10@42.622,38.214 ; CON2.6@39.807,38.24 pad.10@42.622,38.24 ; CON2.6@39.807,38.266 pad.10@42.622,38.266 ; CON2.6@39.808,38.292 pad.10@42.623,38.292 ; CON2.6@39.808,38.318 pad.10@42.623,38.318 ; CON2.6@39.808,38.343 pad.10@42.623,38.343 ; CON2.6@39.808,38.369 pad.10@42.623,38.369 ; CON2.6@39.808,38.395 pad.10@42.623,38.395 ; CON2.6@39.808,38.421 pad.10@42.623,38.421 ; CON2.6@39.808,38.447 pad.10@42.623,38.447 ; CON2.6@39.809,38.473 pad.10@42.624,38.473 ; CON2.6@39.809,38.499 pad.10@42.624,38.499 ; CON2.6@39.809,38.525 pad.10@42.624,38.525 ; CON2.6@39.809,38.551 pad.10@42.624,38.551 ; CON2.6@39.809,38.576 pad.10@42.624,38.576 ; CON2.6@39.809,38.602 pad.10@42.624,38.602 ; CON2.5@39.809,38.628 pad.10@42.624,38.628 ; CON2.5@39.81,38.654 pad.10@42.625,38.654 ; CON2.5@39.81,38.68 pad.10@42.625,38.68 ; CON2.5@39.81,38.706 pad.10@42.625,38.706 ; CON2.5@39.81,38.732 pad.10@42.625,38.732 ; CON2.5@39.81,38.758 pad.10@42.625,38.758 ; CON2.5@39.81,38.783 pad.10@42.625,38.783 ; CON2.5@39.81,38.809 pad.10@42.625,38.809 ; CON2.5@39.811,38.835 pad.10@42.626,38.835 ; CON2.5@39.811,38.861 pad.10@42.626,38.861 ; CON2.5@39.811,38.887 pad.10@42.626,38.887 ; CON2.5@39.811,38.913 pad.10@42.626,38.913 ; CON2.5@39.811,38.939 pad.10@42.626,38.939 ; CON2.5@39.811,38.965 pad.10@42.626,38.965 ; CON2.5@39.812,38.991 pad.10@42.627,38.991 ; CON2.5@39.812,39.016 pad.10@42.627,39.016 ; CON2.5@39.812,39.042 pad.10@42.627,39.042 ; CON2.5@39.812,39.068 pad.10@42.627,39.068 ; CON2.5@39.812,39.094 pad.10@42.627,39.094 ; CON2.5@39.812,39.12 pad.10@42.627,39.12 ; CON2.5@39.812,39.146 pad.10@42.627,39.146 ; CON2.5@39.813,39.172 pad.10@42.628,39.172 ; CON2.5@39.813,39.198 pad.10@42.628,39.198 ; CON2.5@39.813,39.223 pad.10@42.628,39.223 ; CON2.5@39.813,39.249 pad.10@42.628,39.249 ; CON2.2@39.818,43.398 39.818,41.916 39.698,41.916 39.698,43.48 CON2.2@39.923,43.48 ; CB28.1@39.831,30.03 40.325,29.536 40.325,29.408 40.523,29.211 CB27.2@40.523,28.936 ; CON2.6@39.836,37.693 39.836,37.09 39.716,37.09 39.716,37.863 CON2.6@39.903,37.863 ; 39.861,41.773 39.861,41.916 ; 39.981,37.07 40.177,37.07 pad.10@41.088,37.981 ; 40.116,37.07 40.271,37.07 ; 40.676,40.215 39.983,40.215 ; pad.10@40.733,39.249 ccw(c39.769,39.275) 39.983,40.215 ; CB69.2@40.735,12.686 41.38,12.041 v1(41.628,12.041) ; CB76.1@40.903,10.531 41.415,10.531 v1(41.64,10.756) ; pad.10@41.028,37.828 40.271,37.07 ; CB54.2@41.485,18.686 41.485,19.09 42.161,19.766 v1(42.673,19.766) ; CB26.2@41.553,28.893 41.353,29.093 41.353,29.758 41.664,30.068 v1(41.975,30.068) ; CB68.2@41.813,12.723 42.423,12.113 v1(42.423,12.021) ; CB75.1@42.245,9.57 42.245,10.551 v1(42.418,10.723) ; pad.10@42.293,40.558 45.708,40.558 46.543,39.723 46.543,37.505 46.201,37.163 45.078,37.163 pad.10@44.763,37.478 ; pad.10@44.226,37.315 44.226,37.125 47.058,34.293 ; v1(45.713,10.238) 45.318,9.843 45.318,9.523 v1(46.013,9.523) ; 46.328,24.38 JB1.21@46.328,25.528 ; JB1.21@46.331,26.715 JB1.21@46.488,26.715 ; 46.443,26.785 46.558,26.785 ; 46.526,24.31 JB1.21@46.526,25.135 ; JB1.21@46.631,26.018 46.631,26.973 ; 46.678,24.058 JB1.21@46.678,25.235 ; JB1.21@46.766,26.243 46.766,27.108 ; 46.843,23.938 JB1.21@46.843,25.298 ; JB1.21@46.898,26.168 46.898,27.235 ; 47.058,23.54 46.128,24.47 46.128,26.7 47.053,27.625 47.058,27.625 ; 19.373,23.038 19.373,23.8 19.621,24.048 19.621,25.305 20.133,25.818 20.506,25.818 20.506,23.358 20.063,23.358 20.063,23.028 19.806,22.77 19.641,22.77 19.373,23.038 ; 20.978,33.963 20.978,37.135 21.336,37.493 22.183,37.493 22.541,37.135 22.541,34.273 22.001,33.733 21.208,33.733 20.978,33.963 ; 28.853,34.408 28.853,37.163 29.268,37.578 30.003,37.578 30.441,37.14 30.441,33.818 29.443,33.818 28.853,34.408
  BottomLayer w0.305: 4.453,37.058 4.493,37.058 4.698,36.853 5.173,36.853 ; 4.626,36.67 5.048,36.67 ; v1(11.46,35.656) 11.46,35.5 RB4.2@11.733,35.228 11.733,35.212 11.44,34.92 v1(11.44,34.823) 11.567,34.823 DB10.2@11.915,34.475 11.915,34.263 v1(11.613,33.961) ; v1(13.745,34.003) 13.745,34.158 DB9.2@13.428,34.475 13.751,34.798 v1(13.853,34.798) 13.573,35.078 13.573,35.143 13.775,35.345 v1(13.775,35.626) 13.959,35.626 15.215,36.882 CB11.1@15.215,37.21 ; J3.26@16.69,4.868 v1(16.69,6.316) ; CB10.1@17.115,36.57 17.72,35.966 18.092,35.966 RB10.2@18.283,35.775 17.993,35.486 17.977,35.486 DB8.2@18.428,35.035 ; v1(17.358,12.403) 17.94,12.986 RB30.2@17.94,14.218 ; v1@17.878,35.966 17.878,35.838 18.013,35.703 ; J3.20@18.19,4.868 v1(18.19,6.336) ; CB9.2@18.373,39.57 18.598,39.796 v1(18.85,39.796) ; J3.14@19.69,4.868 v1@19.69,6.318 ; v1(20.473,34.846) 20.18,34.846 DB7.2@19.985,35.04 20.356,35.411 v1(20.49,35.411) 20.435,35.411 20.113,35.733 RB9.1@20.113,35.788 20.253,35.928 v1(20.533,35.928) ; v1(20.695,13.223) 20.558,13.36 20.558,13.8 RB27.1@21.446,13.8 ; J3.8@21.19,4.868 v1@21.19,6.308 ; J3.2@22.69,4.868 v1@22.69,6.331 ; v1(22.838,15.618) 22.838,15.773 RB21.1@23.265,16.2 ; 23.766,14.801 YB1.4@24.573,14.801 v1@24.573,15.618 ; 25.348,12.6 25.348,12.998 25.738,13.388 25.738,13.35 26.253,12.835 26.253,12.68 ; UB1.4@28.433,15.208 28.433,15.486 28.3,15.618 24.201,15.618 23.766,15.183 23.766,12.91 24.076,12.6 27.046,12.6 27.666,11.98 29.283,11.98 29.86,11.403 v1(30.16,11.403) ; 29.891,43.753 29.956,43.688 32.88,43.688 CB1.1@33.185,43.383 ; v1(30.953,35.703) 31.253,35.403 31.253,35.183 v1(30.928,34.858) 31.05,34.858 31.377,34.531 31.377,34.493 v1(31.005,34.121) ; CB56.1@31.272,19.528 RB19.1@32.203,19.528 ; v1(33.343,34.238) 33.212,34.238 DB5.2@32.953,34.498 33.321,34.866 v1(33.495,34.866) 33.452,34.866 RB7.1@33.098,35.22 33.098,35.408 v1(33.378,35.688) 33.378,35.913 CB5.1@34.085,36.62 ; v1(34.703,6.271) 34.925,6.048 J4.44@34.925,4.868 ; v1(36.208,6.291) 36.425,6.073 J4.38@36.425,4.868 ; CB4.1@36.518,36.633 36.373,36.488 36.373,35.413 37.525,35.413 RB6.2@37.65,35.538 ; v1(37.17,34.943) 37.682,34.943 DB4.2@37.815,34.81 37.308,34.303 v1(37.198,34.303) ; v1(37.695,6.268) 37.925,6.038 J4.32@37.925,4.868 ; v1(39.213,6.268) 39.425,6.056 J4.26@39.425,4.868 ; DB3.2@39.318,34.79 39.753,34.355 v1(39.753,34.206) ; RB5.1@39.498,35.535 40.04,34.993 v1(40.04,34.778) ; 40.093,40.84 47.058,40.84 47.058,9.493 46.523,9.493 46.523,10.135 45.901,10.758 45.901,12.498 46.636,12.498 47.058,12.92 ; v1(40.715,6.273) 40.925,6.063 J4.20@40.925,4.868 ; CB24.2@44.066,28.675 44.581,29.191 44.581,29.177 CB23.2@44.938,28.82 ; JB1.22@46.368,10.643 46.816,10.643 v1@46.816,9.695 ; 46.476,10.438 46.723,10.438 ; v1@46.723,9.705 JB1.22@46.723,10.643
  BottomLayer w0.33: J3.34@14.69,4.868 14.69,6.25 15.708,7.267 v1(15.708,7.288) ; 40.688,23.27 40.688,23.943 ; 40.781,23.82 40.781,23.413 40.896,23.298 ; 41.101,24.208 41.338,24.445 41.338,24.73 41.748,25.14 42.306,25.14 v1@42.691,24.755 ; 41.238,24.983 41.676,25.42 42.293,25.42 ; 43.128,25 43.801,25 44.001,24.8 44.001,23.11 43.533,23.11 43.533,23.32 43.806,23.593 43.806,24.675 43.708,24.773
  BottomLayer w0.381: 4.588,40.753 4.453,40.618 4.453,6.405 4.69,6.168 J3.74@4.69,4.868 ; 4.781,5.985 6.19,5.985 ; J3.72@5.19,4.868 5.19,6.655 ; 5.688,9.203 6.401,9.203 ; J3.70@5.69,4.868 v1@5.69,6.983 ; pad.11@5.811,11.603 4.741,11.603 4.741,10.073 5.363,9.45 6.123,9.45 7.446,10.773 pad.11@7.446,11.513 ; 5.843,6.275 5.843,8.645 7.588,10.39 pad.11@7.588,10.845 ; J3.68@6.19,4.868 6.19,9.037 ; pad.9@9.903,39.193 11.633,39.193 CON1.4@11.633,39.293 ; 10.931,39.995 CON1.4@11.633,39.293 ; J3.48@11.19,4.868 11.19,5.975 ; 11.633,37.325 CON1.4@11.633,39.293 ; 11.68,42.018 v2(11.68,43.738) 13.031,43.738 ; J3.46@11.69,4.868 11.69,6.313 v1@12.443,6.313 ; v1@11.831,6.565 v1@12.483,6.565 ; J3.44@12.19,4.868 v1@12.19,6.313 ; v1@12.673,5.975 11.19,5.975 ; J3.42@12.69,4.868 12.69,6.036 12.751,6.096 12.751,6.638 12.463,6.925 11.748,6.925 11.523,6.7 11.523,6.308 11.19,5.975 ; J4.74@27.425,4.868 27.425,6.233 27.328,6.33 27.328,8.165 27.453,8.29 27.453,9.525 27.638,9.525 27.638,7.48 27.925,7.193 J4.72@27.925,4.868 ; 27.526,6.025 27.925,6.025 ; 27.553,7.225 27.638,7.14 27.638,6.025 ; J4.58@31.425,4.868 31.425,6.543 v1(31.7,6.818) 31.925,6.593 J4.56@31.925,4.868 ; J4.10@43.425,4.868 43.425,6.86 43.513,6.948 44.131,6.948 44.425,6.653 J4.6@44.425,4.868 ; 43.425,6.023 44.258,6.023 ; v1@43.54,6.363 v1@44.263,6.363 ; 43.718,6.675 44.253,6.675
  BottomLayer w0.432: CB2.1@18.076,43.788 18.666,44.378 19.141,44.378 19.141,43.458 18.468,43.458 ; CB2.1@18.361,43.693 18.811,43.693 18.811,44.035 ; 18.528,43.925 18.811,43.925 ; 21.636,43.595 21.636,44.205 29.936,44.205 ; 21.936,43.865 29.791,43.865 ; C216.2@24.648,17.533 24.648,17.303 24.676,17.275 24.676,17.05 25.853,17.05 25.853,17.235 26.203,17.585 v1(26.533,17.585) ; 25.601,17.375 25.601,17.318 24.803,17.318 24.803,17.693 26.126,17.693 ; 30.008,44.435 21.356,44.435 21.356,43.033 21.906,43.583 30.083,43.583 30.083,44.363
  BottomLayer w0.457: CB37.1@40.313,23.208 40.313,23.713 40.988,24.388 40.988,25.273 41.543,25.273 41.898,25.628 42.013,25.628 42.301,25.915 42.588,25.628 42.588,25.225 42.818,24.995 ; CB37.1@40.496,23.015 40.548,23.068 CB35.2@40.988,23.068
  BottomLayer w0.508: 11.473,40.983 11.473,41.8 12.118,41.8 12.508,42.19 ; 11.688,41.45 11.808,41.45 ; 11.828,41.245 12.486,41.903 12.486,41.965 ; 12.806,42.87 12.806,44.28 14.871,44.28 15.058,44.093 15.058,43.308 13.163,43.308 13.011,43.155 ; 13.088,43.89 DB2.1@13.963,43.89 ; 13.156,43.715 DB2.1@13.766,43.715 ; 40.213,40.528 pad.10@41.713,40.528 ; 40.676,40.215 40.968,39.923 pad.10@40.968,39.218 ; pad.10@40.791,38.783 40.796,38.783 pad.10@40.796,37.603 ; 41.126,40.305 pad.10@41.586,40.305 ; pad.10@44.538,40.73 46.798,40.73 46.798,34.835 ; pad.10@44.931,36.763 46.701,34.993 ; pad.10@45.211,36.81 46.141,36.81 46.583,37.253 ; 45.696,36.645 45.503,36.645 46.078,36.07 v1@46.078,35.843 ; 45.981,36.388 46.476,36.388 46.593,36.27 ; 46.033,40.493 46.186,40.493 46.651,40.028 ; v1@46.471,35.608 46.471,36.82
  BottomLayer w0.737: 4.648,31.82 4.648,36.09 pad.9@5.973,37.415 ; v1@4.668,15.955 6.106,14.518 pad.11@6.106,13.503 ; 4.688,31.078 5.148,31.538 5.148,35.13 pad.9@6.678,36.66 ; 4.743,15.128 4.743,11.933 pad.11@5.773,11.933 ; 4.766,9.643 4.766,6.57 5.906,6.57 5.906,9.085 ; 5.071,35.655 5.071,35.885 pad.9@6.076,36.89 ; 5.178,14.943 pad.11@6.453,13.205 ; 5.328,6.995 5.328,9.163 ; pad.11@5.356,12.195 5.378,14.403 5.921,13.19 pad.11@5.988,13.113
  BottomLayer w0.762: pad.9@9.268,40.473 11.091,40.473 11.191,40.573 ; pad.9@9.576,39.995 10.193,39.995 ; pad.9@9.731,39.655 10.581,39.655 10.581,40.095 ; 21.281,37.08 21.281,34.163 21.706,34.163 22.141,34.598 CB8.2@22.141,36.288 ; CB18.2@21.816,35.52 CB8.2@21.816,35.97 ; CB17.1@29.266,35.055 CB7.1@29.266,36.51 ; CB17.1@29.431,34.725 CB7.1@29.431,36.615 ; CB7.1@30.006,37.078 30.071,37.013 CB17.1@30.071,34.158
  other v1: 12.74,6.086 5.513,6.166 6.155,6.163 4.888,6.201 11.745,6.196 12.31,6.253 43.953,6.253 33.198,6.273 19.708,6.318 27.435,6.346 43.538,6.361 42.201,6.448 44.313,6.473 12.623,6.521 11.988,6.631 4.76,6.793 5.665,6.836 27.39,6.861 27.333,7.468 15.688,7.693 24.788,8.288 23.225,8.303 46.828,9.616 46.815,10.131 41.645,11.346 42.435,11.376 15.29,11.523 18.3,12.433 19.81,12.426 22.713,12.463 21.215,12.488 31.615,12.758 33.21,12.766 45.405,13.273 46.513,13.283 4.545,14.503 4.528,15.221 29.233,15.613 20.985,15.631 27.39,15.626 28.305,15.626 30.161,15.63 13,15.713 32.44,15.818 33.983,15.818 4.53,15.938 20.086,16.195 24.538,16.933 26.538,16.935 23.985,16.943 25.313,16.945 25.898,16.965 31.1,17.013 13.005,17.278 35.113,17.378 24.583,17.585 25.233,17.585 25.883,17.585 31.106,18.858 35.093,18.873 4.488,18.956 28.483,19.535 31.08,19.741 4.518,19.853 21.34,19.968 36.233,19.978 29.15,20.065 29.68,20.073 31.085,20.643 4.548,20.696 40.855,21.376 23.935,21.42 36.233,21.528 31.093,21.581 4.523,21.661 4.51,22.338 23.283,22.785 35.803,23.113 4.523,23.146 19.655,23.163 45.42,23.303 31.088,23.426 16.333,23.456 4.523,23.793 40.365,23.861 29.718,24.02 31.088,24.346 42.66,24.603 35.793,24.656 25.245,24.668 25.85,24.668 4.52,24.708 26.525,24.7 15.313,24.751 15.903,24.746 45.435,24.886 42.628,25.088 41.58,25.111 42.12,25.121 25.848,25.328 41.598,25.596 42.103,25.586 42.605,25.588 4.513,25.648 15.31,26.021 15.818,26.041 42.095,26.091 15.625,26.488 4.493,26.513 26.47,26.803 15.308,27.443 4.5,27.453 31.933,27.763 4.5,28.158 30.855,28.858 4.5,29.026 44.618,29.191 40.325,29.486 4.52,30.008 30.71,30.398 14.935,30.721 16.458,30.726 20.09,31.113 21.593,31.143 34.073,31.326 35.663,31.326 29.668,31.458 38.893,31.656 40.45,31.648 40.765,32.416 42.343,32.413 4.523,33.378 15.083,33.763 16.668,33.768 30.33,34.028 4.523,34.258 30.36,34.633 4.498,35.216 21.025,35.213 46.455,35.488 4.885,35.621 21.008,35.746 21.51,35.778 45.945,35.808 29.978,35.818 4.528,36.186 21.07,36.288 46.16,36.293 46.95,37.173 18.633,38.053 38.1,38.138 13.085,38.173 32.58,38.281 36.338,38.751 15.215,38.776 16.855,38.763 18.88,38.773 32.668,38.778 34.68,38.766 38.378,38.776 13.18,38.788 32.808,39.278 13.348,39.293 46.95,39.306 18.85,39.333 10.873,39.531 10.805,39.801 10.028,40.728 22.573,43.648 23.738,43.676 29.288,43.671 25.778,43.703 28.303,43.708 27.388,43.716 21.825,44.176 24.993,44.166 26.618,44.248 23.183,44.298 29.59,44.341
  other v2: 11.71,38.083 20.24,38.083 31.17,38.083 39.7,38.083 11.71,38.187 20.24,38.187 31.17,38.187 39.7,38.187 11.71,38.291 20.24,38.291 31.17,38.291 11.71,38.395 20.24,38.395 31.17,38.395 39.7,38.395 11.71,38.499 20.24,38.499 31.17,38.499 39.7,38.499 11.71,38.603 20.24,38.603 31.17,38.603 39.7,38.603 11.71,38.706 20.24,38.706 31.17,38.706 39.7,38.706 11.71,38.81 20.24,38.81 31.17,38.81 39.7,38.81 11.71,38.914 20.24,38.914 31.17,38.914 39.7,38.914 11.71,39.018 20.24,39.018 31.17,39.018 39.7,39.018 11.71,39.122 20.24,39.122 31.17,39.122 39.7,39.122 11.71,39.226 11.85,39.226 11.989,39.226 12.128,39.226 12.268,39.226 19.683,39.226 19.822,39.226 19.961,39.226 20.101,39.226 20.24,39.226 31.17,39.226 31.31,39.226 31.449,39.226 31.588,39.226 31.728,39.226 39.143,39.226 39.282,39.226 39.421,39.226 39.561,39.226 39.7,39.226 11.68,43.061 20.32,43.061 31.14,43.061 39.78,43.061 20.32,43.174 31.14,43.174 39.78,43.174 11.68,43.287 20.32,43.287 31.14,43.287 39.78,43.287 11.68,43.4 20.32,43.4 31.14,43.4 39.78,43.4 11.68,43.513 20.32,43.513 31.14,43.513 39.78,43.513 11.68,43.625 20.32,43.625 31.14,43.625 39.78,43.625 31.14,43.738 39.78,43.738 11.68,43.851 20.32,43.851 31.14,43.851 39.78,43.851 11.68,43.964 20.32,43.964 31.14,43.964 39.78,43.964 11.68,44.077 20.32,44.077 31.14,44.077 39.78,44.077 11.68,44.19 20.32,44.19 31.14,44.19 39.78,44.19 11.68,44.303 20.32,44.303 31.14,44.303 39.78,44.303
NetC1_2: C1.2 CON1.A11 D1.1 R1.2 | length 5.3
  TopLayer w0.127: C1.2@12.408,33.763 12.593,33.948 12.593,34.268 12.39,34.47 12.39,34.58 12.59,34.78 12.59,35.058 12.385,35.263 12.385,35.343 12.515,35.473 ccw(c12.31,35.678) 12.6,35.678 12.6,35.953 cw(c12.938,35.953) 12.699,36.191 12.905,36.398 cw(c13.153,36.15) 13.153,36.5 ccw(c13.153,37.128) 13.597,36.684 13.633,36.721 ccw(c13.398,36.955) 13.73,36.955 13.73,37.225 13.613,37.343 CON1.A11@13.613,37.946
NetC2_2: C2.2 CON1.A10 D2.1 R2.1 | length 5.3
  TopLayer w0.127: C2.2@13.018,33.748 12.838,33.928 12.838,34.258 D2.1@13.048,34.467 ; D2.1@13.048,34.523 13.048,34.593 12.823,34.818 12.823,35.073 R2.1@13.033,35.283 12.954,35.362 cw(c13.295,35.703) 12.813,35.703 12.813,35.879 cw(c13.124,35.879) 12.904,36.099 12.914,36.108 cw(c13.431,35.591) 13.431,36.323 ccw(c13.431,36.69) 13.69,36.43 13.811,36.551 ccw(c13.444,36.918) 13.963,36.918 13.963,37.208 14.113,37.358 CON1.A10@14.113,37.946